# Altium PCB Phaser.PcbDoc (part 8 of 16)
Units mm, origin at the board's own origin, x right, y up, seen from the top; angles counter-clockwise.
Board outline 161.99 x 100 mm, 6 copper layers (TopLayer, MidLayer1, MidLayer2, SignalLayer1, Internal Plane 1, BottomLayer), stack 1.528 mm thick; 1017 components, 665 nets, 3453 pads, 2223 vias.
Unrouted connection lines stored in the file: 1.
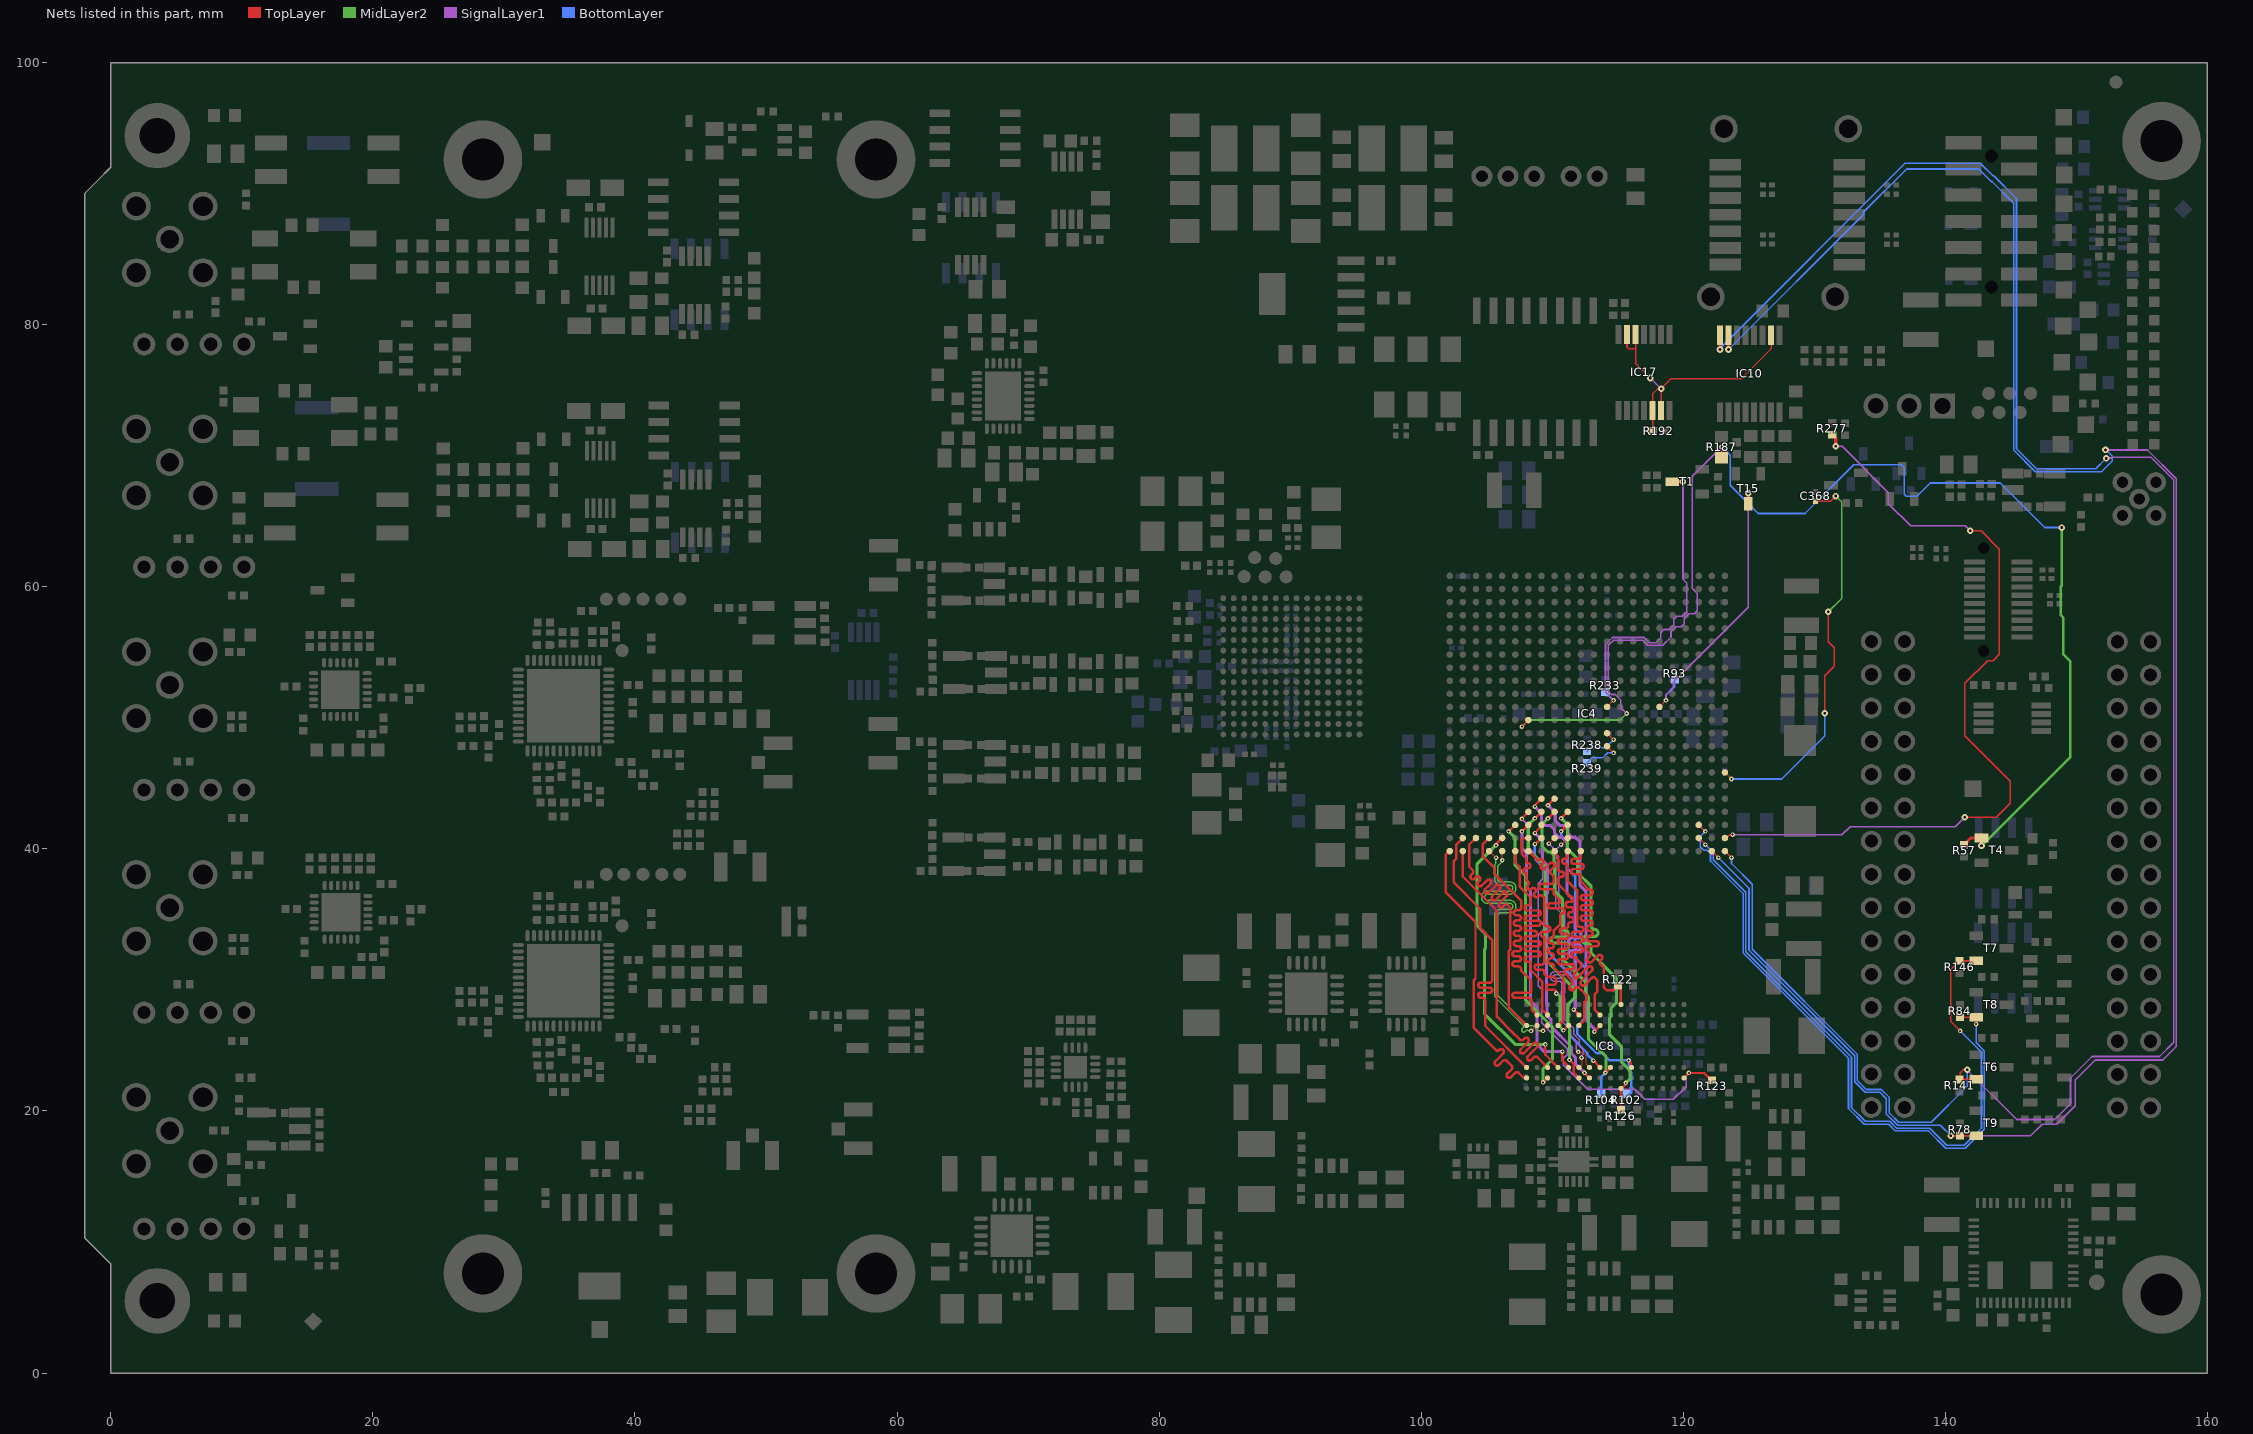
[diagram p10: the nets of this part, all layers, seen from the top]

## Via types
v1: diameter 0.5, hole 0.2, TopLayer to BottomLayer, tented both sides, 1374 vias
v2: diameter 0.35, hole 0.15, TopLayer to BottomLayer, tented both sides, 728 vias
v3: diameter 0.5, hole 0.2, TopLayer to BottomLayer, tented top, 96 vias
v4: diameter 0.6, hole 0.3, TopLayer to BottomLayer, 18 vias
v5: diameter 0.5, hole 0.2, TopLayer to BottomLayer, 5 vias
v6: diameter 0.35, hole 0.15, TopLayer to BottomLayer, 1 vias
v7: diameter 0.8, hole 0.5, TopLayer to BottomLayer, tented both sides, 1 vias

## Nets (pads, with @x,y where several pads share a name; then routed paths per layer and width w, separated by ;. In a path a pad name is that pad's centre, name@x,y a point inside that pad or via, vN(x,y) a via of type N, cw(c..) or ccw(c..) an arc to the next point about the centre after c; other vN are vias at no path point) (continued)
DDR3_CKE: IC4.L1 IC8.K9 R122.2 | length 25.4
  TopLayer w0.19: IC4.L1@112.175,39.825 112.175,39.63 112.175,39.435 cw(c111.98,39.435) 111.98,39.24 111.649,39.24 ccw(c111.649,39.045) 111.454,39.045 ccw(c111.649,39.045) 111.649,38.85 112.175,38.85 112.195,38.85 cw(c112.195,38.655) 112.39,38.655 cw(c112.195,38.655) 112.195,38.46 112.175,38.46 111.649,38.46 ccw(c111.649,38.265) 111.454,38.265 ccw(c111.649,38.265) 111.649,38.07 111.98,38.07 cw(c111.98,37.875) 112.175,37.875 112.175,37.68 112.175,37.522 112.64,37.057 ccw(c112.835,37.057) 112.835,36.862 112.891,36.862 cw(c112.891,36.667) 113.086,36.667 cw(c112.891,36.667) 112.891,36.472 112.64,36.472 112.364,36.472 ccw(c112.364,36.277) 112.169,36.277 ccw(c112.364,36.277) 112.364,36.082 112.64,36.082 112.891,36.082 cw(c112.891,35.887) 113.086,35.887 cw(c112.891,35.887) 112.891,35.692 112.64,35.692 112.364,35.692 ccw(c112.364,35.497) 112.169,35.497 ccw(c112.364,35.497) 112.364,35.302 112.64,35.302 112.891,35.302 cw(c112.891,35.107) 113.086,35.107 cw(c112.891,35.107) 112.891,34.912 112.64,34.912 112.364,34.912 ccw(c112.364,34.717) 112.169,34.717 ccw(c112.364,34.717) 112.364,34.522 112.64,34.522 112.891,34.522 cw(c112.891,34.327) 113.086,34.327 cw(c112.891,34.327) 112.891,34.132 112.835,34.132 ccw(c112.835,33.937) 112.64,33.937 ccw(c112.835,33.937) 112.835,33.742 112.891,33.742 cw(c112.891,33.547) 113.086,33.547 cw(c112.891,33.547) 112.891,33.352 112.835,33.352 ccw(c112.835,33.157) 112.64,33.157 ccw(c112.835,33.157) 112.835,32.962 113.355,32.962 cw(c113.355,32.767) 113.55,32.767 cw(c113.355,32.767) 113.355,32.572 112.835,32.572 ccw(c112.835,32.377) 112.64,32.377 112.64,32.228 112.69,32.178 112.699,32.169 112.836,32.032 cw(c112.699,31.894) 112.836,31.756 112.73,31.65 ccw(c112.868,31.512) 112.73,31.374 ccw(c112.868,31.512) 113.006,31.374 113.25,31.618 113.483,31.851 cw(c113.621,31.713) 113.759,31.851 cw(c113.621,31.713) 113.759,31.575 113.664,31.48 ccw(c113.802,31.342) 113.664,31.204 113.802,31.066 113.94,30.928 113.94,30.253 113.939,29.421 114.158,29.203 114.66,29.203 R122.2@115.015,29.558 115.241,29.332 IC8.K9@115.241,28.12
DDR3_DQ0: IC4.G3 IC8.E3 | length 21
  TopLayer w0.19: v2(107.675,41.325) IC4.G3@108.175,41.825 ; v2(110.765,24.528) 110.765,23.844 111.265,23.344 IC8.E3@111.241,23.32
  SignalLayer1 w0.24: v2(107.675,41.325) 107.675,40.04 108.02,39.696 108.02,37.078 108.34,36.758 108.34,28.398 108.845,27.893 108.845,25.069 109.386,24.528 v2(110.765,24.528)
DDR3_DQ1: IC4.J1 IC8.F7 | length 23.4
  TopLayer w0.19: IC4.J1@110.175,39.67 110.465,39.38 110.465,38.953 110.465,38.646 110.465,38.451 ccw(c110.66,38.451) 110.66,38.256 110.701,38.256 cw(c110.701,38.061) 110.896,38.061 cw(c110.701,38.061) 110.701,37.866 110.66,37.866 ccw(c110.66,37.671) 110.465,37.671 110.465,37.476 110.465,37.281 111.215,36.531 ccw(c111.41,36.531) 111.41,36.336 111.416,36.336 cw(c111.416,36.141) 111.611,36.141 cw(c111.416,36.141) 111.416,35.946 111.215,35.946 111.193,35.946 ccw(c111.193,35.751) 110.998,35.751 ccw(c111.193,35.751) 111.193,35.556 111.215,35.556 111.416,35.556 cw(c111.416,35.361) 111.611,35.361 cw(c111.416,35.361) 111.416,35.166 111.41,35.166 ccw(c111.41,34.971) 111.215,34.971 ccw(c111.41,34.971) 111.41,34.776 111.416,34.776 cw(c111.416,34.581) 111.611,34.581 cw(c111.416,34.581) 111.416,34.386 111.373,34.386 ccw(c111.373,34.228) 111.215,34.228 111.215,34.203 111.215,34.121 cw(c111.02,34.121) 111.02,33.926 110.776,33.926 ccw(c110.776,33.731) 110.581,33.731 ccw(c110.776,33.731) 110.776,33.536 111.02,33.536 cw(c111.02,33.341) 111.215,33.341 cw(c111.02,33.341) 111.02,33.146 110.626,33.146 ccw(c110.626,32.951) 110.431,32.951 ccw(c110.626,32.951) 110.626,32.756 111.02,32.756 cw(c111.02,32.561) 111.215,32.561 cw(c111.02,32.561) 111.02,32.366 110.626,32.366 ccw(c110.626,32.171) 110.431,32.171 ccw(c110.626,32.171) 110.626,31.976 111.02,31.976 cw(c111.02,31.781) 111.215,31.781 cw(c111.02,31.781) 111.02,31.586 110.626,31.586 ccw(c110.626,31.391) 110.431,31.391 ccw(c110.626,31.391) 110.626,31.196 111.215,31.196 111.5,31.196 cw(c111.5,31.001) 111.695,31.001 cw(c111.5,31.001) 111.5,30.806 111.215,30.806 111.123,30.806 ccw(c111.123,30.611) 110.928,30.611 ccw(c111.123,30.611) 111.123,30.416 cw(c111.123,30.324) 111.215,30.324 111.215,30.221 111.353,30.083 111.491,29.946 cw(c111.353,29.808) 111.491,29.67 111.368,29.547 ccw(c111.506,29.409) 111.368,29.272 ccw(c111.506,29.409) 111.644,29.272 111.767,29.394 cw(c111.904,29.256) 112.042,29.394 112.18,29.256 112.456,28.98 112.624,28.812 112.624,28.464 112.449,28.289 112.449,26.928 IC8.F7@112.041,26.52
DDR3_DQ2: IC4.H4 IC8.F2 | length 22.8
  TopLayer w0.19: v2(108.675,42.325) IC4.H4@109.175,42.825 ; v2(111.315,23.903) 111.64,23.578 111.64,22.921 IC8.F2@112.041,22.52
  MidLayer2 w0.24: v2(108.675,42.325) 108.165,41.815 108.165,39.953 109.44,38.678 109.44,31.553 111.749,29.244 111.749,28.679 111.188,28.117 111.188,26.744 111.315,26.617 v2(111.315,23.903)
DDR3_DQ3: IC4.H5 IC8.F8 | length 21.3
  TopLayer w0.19: v2@108.675,43.325 IC4.H5@109.175,43.825 ; v2(111.635,27.726) IC8.F8@112.041,27.32
  SignalLayer1 w0.24: v2(108.675,43.225) 108.675,43.218 109.165,42.728 109.165,42.103 109.498,41.77 109.859,41.77 110.175,41.454 110.175,41.196 110.491,40.88 110.749,40.88 111.12,40.509 111.12,40.428 111.12,37.003 111.12,36.598 111.755,35.963 111.755,34.628 111.755,33.928 ccw(c111.995,33.928) 111.995,33.688 ; v2(111.635,27.726) 111.759,27.85 111.755,27.855 111.755,31.528 ccw(c111.515,31.528) 111.515,31.768 111.486,31.768 cw(c111.486,32.008) 111.246,32.008 cw(c111.486,32.008) 111.486,32.248 111.755,32.248 111.951,32.248 ccw(c111.951,32.488) 112.191,32.488 ccw(c111.951,32.488) 111.951,32.728 111.755,32.728 111.486,32.728 cw(c111.486,32.968) 111.246,32.968 cw(c111.486,32.968) 111.486,33.208 111.755,33.208 111.951,33.208 ccw(c111.951,33.448) 112.191,33.448 ccw(c111.951,33.448) 111.951,33.688 111.995,33.688
DDR3_DQ4: IC4.H2 IC8.H3 | length 22
  TopLayer w0.19: v2@108.755,40.405 IC4.H2@109.175,40.825 ; v2(113.13,23.838) 113.13,23.835 113.641,23.323 IC8.H3@113.641,23.32
  BottomLayer w0.19: v2@108.665,40.315 108.665,39.503 109.475,38.693 109.475,33.341 ; v2(113.13,23.838) 112.649,24.318 112.649,24.437 111.34,25.746 111.34,26.353 111.165,26.528 111.165,28.053 111.724,28.612 111.724,30.04 110.219,31.545 ; 109.475,33.341 ccw(c112.015,33.341) 110.219,31.545 ; 109.475,33.341 ccw(c112.015,33.341) 110.219,31.545
  other v2: 108.665,40.353
DDR3_DQ5: IC4.K1 IC8.H8 | length 22.9
  TopLayer w0.19: IC4.K1@111.175,39.825 111.175,39.649 111.175,39.454 cw(c110.98,39.454) 110.98,39.259 110.939,39.259 ccw(c110.939,39.064) 110.744,39.064 ccw(c110.939,39.064) 110.939,38.869 110.98,38.869 cw(c110.98,38.674) 111.175,38.674 111.175,38.153 111.175,37.547 111.89,36.832 111.89,35.053 111.89,34.828 111.89,34.449 111.89,34.254 ccw(c112.085,34.254) 112.085,34.059 112.17,34.059 cw(c112.17,33.864) 112.365,33.864 cw(c112.17,33.864) 112.17,33.669 111.89,33.669 111.689,33.669 ccw(c111.689,33.474) 111.494,33.474 ccw(c111.689,33.474) 111.689,33.279 111.89,33.279 112.17,33.279 cw(c112.17,33.084) 112.365,33.084 cw(c112.17,33.084) 112.17,32.889 111.89,32.889 111.689,32.889 ccw(c111.689,32.694) 111.494,32.694 ccw(c111.689,32.694) 111.689,32.499 111.89,32.499 112.166,32.499 cw(c112.166,32.304) 112.361,32.304 cw(c112.166,32.304) 112.166,32.109 111.89,32.109 111.689,32.109 ccw(c111.689,31.914) 111.494,31.914 ccw(c111.689,31.914) 111.689,31.719 111.695,31.719 cw(c111.695,31.524) 111.89,31.524 111.961,31.453 112.035,31.379 112.172,31.242 cw(c112.035,31.104) 112.172,30.966 111.657,30.45 ccw(c111.794,30.312) 111.657,30.174 ccw(c111.794,30.312) 111.932,30.174 112.586,30.828 112.739,30.981 cw(c112.877,30.843) 113.015,30.981 cw(c112.877,30.843) 113.015,30.705 112.862,30.552 112.208,29.898 ccw(c112.346,29.76) 112.208,29.623 ccw(c112.346,29.76) 112.484,29.623 113,30.138 cw(c113.138,30.001) 113.276,30.138 113.425,29.989 113.425,29.089 113.257,28.921 113.257,27.704 IC8.H8@113.641,27.32
DDR3_DQ6: IC4.H3 IC8.G2 | length 21.3
  TopLayer w0.19: v2@108.665,41.228 109.175,41.738 IC4.H3@109.175,41.825 ; v2(112.458,22.903) IC8.G2@112.841,22.52
  SignalLayer1 w0.24: v2(108.665,41.203) 109.245,40.623 109.245,40.278 109.245,39.119 109.64,38.724 109.64,36.653 109.54,36.553 109.54,34.809 109.534,34.804 109.534,34.373 109.576,34.332 109.576,33.019 109.559,33.003 109.559,28.225 109.585,28.2 109.585,27.283 109.91,26.958 109.91,26.433 111.465,24.878 111.465,24.382 111.76,24.087 111.76,23.601 v2(112.458,22.903)
DDR3_DQ7: IC4.J5 IC8.H7 | length 20.4
  TopLayer w0.19: v2(109.675,43.325) IC4.J5@110.175,43.825 ; v2(113.211,26.053) 113.211,26.072 113.641,26.501 IC8.H7@113.641,26.52
  SignalLayer1 w0.24: v2(109.675,43.325) 110.222,42.778 110.222,42.149 110.601,41.77 110.859,41.77 111.175,41.454 111.175,41.196 111.491,40.88 111.763,40.88 112.125,40.518 112.125,37.193 112.559,36.758 112.559,28.912 112.649,28.822 112.649,26.839 113.211,26.278 v2(113.211,26.053)
DDR3_DQ8: IC4.G1 IC8.D7 | length 22.5
  TopLayer w0.19: IC4.G1@108.175,39.825 108.192,39.825 108.789,39.228 ; 108.79,39.228 108.853,39.165 ccw(c108.928,39.239) 109.003,39.165 cw(c109.14,39.027) 109.278,39.165 cw(c109.14,39.027) 109.278,38.889 109.204,38.814 109.172,38.783 ccw(c109.31,38.645) 109.172,38.507 ccw(c109.31,38.645) 109.448,38.507 109.479,38.539 109.836,38.896 cw(c109.974,38.758) 110.112,38.896 cw(c109.974,38.758) 110.112,38.62 109.893,38.401 ccw(c110.031,38.263) 109.893,38.125 110.031,37.987 110.115,37.903 110.115,37.708 110.115,37.513 cw(c109.92,37.513) 109.92,37.318 109.19,37.318 ccw(c109.19,37.123) 108.995,37.123 ccw(c109.19,37.123) 109.19,36.928 109.92,36.928 cw(c109.92,36.733) 110.115,36.733 110.115,36.549 110.615,36.049 110.615,36.038 cw(c110.42,36.038) 110.42,35.843 109.864,35.843 ccw(c109.864,35.648) 109.669,35.648 ccw(c109.864,35.648) 109.864,35.453 110.615,35.453 110.741,35.453 cw(c110.741,35.258) 110.936,35.258 cw(c110.741,35.258) 110.741,35.063 ccw(c110.741,34.937) 110.615,34.937 110.615,34.673 110.615,34.478 ; 110.114,30.978 110.114,30.949 110.824,30.239 110.824,28.28 110.825,28.279 110.825,26.905 IC8.D7@110.441,26.52 ; 110.115,30.978 110.115,31.048 ccw(c109.92,31.048) 109.92,31.243 109.864,31.243 cw(c109.864,31.438) 109.669,31.438 cw(c109.864,31.438) 109.864,31.633 109.92,31.633 ccw(c109.92,31.828) 110.115,31.828 ccw(c109.92,31.828) 109.92,32.023 109.864,32.023 cw(c109.864,32.218) 109.669,32.218 cw(c109.864,32.218) 109.864,32.413 109.92,32.413 ccw(c109.92,32.608) 110.115,32.608 ccw(c109.92,32.608) 109.92,32.803 109.864,32.803 cw(c109.864,32.998) 109.669,32.998 cw(c109.864,32.998) 109.864,33.193 109.92,33.193 ccw(c109.92,33.388) 110.115,33.388 110.115,33.583 110.115,33.778 110.615,34.278 ; 110.614,34.278 110.614,34.478
DDR3_DQ9: IC4.B1 IC8.C3 | length 23.5
  TopLayer w0.19: IC4.B1@103.175,39.825 103.165,39.815 103.165,37.878 105.765,35.278 105.765,27.196 106.937,26.024 107.521,25.44 ccw(c107.656,25.574) 107.79,25.44 107.883,25.532 cw(c108.017,25.398) 108.152,25.532 cw(c108.017,25.398) 108.152,25.263 107.925,25.036 107.591,24.703 ccw(c107.725,24.569) 107.591,24.434 ccw(c107.725,24.569) 107.86,24.434 108.193,24.768 108.582,25.157 cw(c108.717,25.023) 108.851,25.157 cw(c108.717,25.023) 108.851,24.888 108.462,24.499 108.129,24.166 ccw(c108.263,24.031) 108.129,23.897 ccw(c108.263,24.031) 108.397,23.897 108.596,24.096 cw(c108.731,23.962) 108.865,24.096 IC8.C3@109.641,23.32
DDR3_DQ10: IC4.F1 IC8.C8 | length 24.1
  TopLayer w0.19: IC4.F1@107.174,39.825 107.174,38.955 107.509,38.62 107.509,37.129 108.369,36.269 108.369,36.074 108.369,35.879 cw(c108.174,35.879) 108.174,35.684 108.088,35.684 ccw(c108.088,35.489) 107.893,35.489 ccw(c108.088,35.489) 108.088,35.294 108.369,35.294 108.92,35.294 cw(c108.92,35.099) 109.115,35.099 cw(c108.92,35.099) 108.92,34.904 108.369,34.904 108.088,34.904 ccw(c108.088,34.709) 107.893,34.709 ccw(c108.088,34.709) 108.088,34.514 108.369,34.514 108.915,34.514 cw(c108.915,34.319) 109.11,34.319 cw(c108.915,34.319) 108.915,34.124 108.369,34.124 108.088,34.124 ccw(c108.088,33.929) 107.893,33.929 ccw(c108.088,33.929) 108.088,33.734 108.369,33.734 108.634,33.734 cw(c108.634,33.539) 108.829,33.539 cw(c108.634,33.539) 108.634,33.344 108.369,33.344 108.088,33.344 ccw(c108.088,33.149) 107.893,33.149 ccw(c108.088,33.149) 108.088,32.954 108.369,32.954 108.915,32.954 cw(c108.915,32.759) 109.11,32.759 cw(c108.915,32.759) 108.915,32.564 108.369,32.564 108.088,32.564 ccw(c108.088,32.369) 107.893,32.369 ccw(c108.088,32.369) 108.088,32.174 108.369,32.174 108.915,32.174 cw(c108.915,31.979) 109.11,31.979 cw(c108.915,31.979) 108.915,31.784 108.369,31.784 108.088,31.784 ccw(c108.088,31.589) 107.893,31.589 ccw(c108.088,31.589) 108.088,31.394 108.174,31.394 cw(c108.174,31.199) 108.369,31.199 108.369,31.004 108.369,30.778 108.369,30.732 109.248,29.853 109.248,29.63 109.248,29.288 109.249,29.287 109.249,27.711 IC8.C8@109.641,27.32
DDR3_DQ11: IC4.F3 IC8.C2 | length 22
  TopLayer w0.19: v2(106.675,41.325) IC4.F3@107.175,41.825 ; v2(109.299,22.178) IC8.C2@109.641,22.52
  MidLayer2 w0.24: v2(106.675,41.325) 107.165,40.835 107.165,38.75 107.965,37.95 107.965,28.453 110.015,26.403 110.015,23.953 109.299,23.237 v2(109.299,22.178)
DDR3_DQ12: IC4.C2 IC8.A7 | length 23.5
  TopLayer w0.19: IC4.C2@104.175,40.825 103.665,40.315 103.665,39.622 103.655,39.612 103.655,38.651 103.789,38.516 103.924,38.382 cw(c103.789,38.248) 103.924,38.113 103.807,37.997 ccw(c103.941,37.862) 103.807,37.728 ccw(c103.941,37.862) 104.076,37.728 104.192,37.845 cw(c104.327,37.71) 104.461,37.845 cw(c104.327,37.71) 104.461,37.576 104.344,37.459 ccw(c104.479,37.325) 104.344,37.191 ccw(c104.479,37.325) 104.613,37.191 104.864,37.442 105.022,37.6 cw(c105.156,37.465) 105.291,37.6 cw(c105.156,37.465) 105.291,37.331 105.133,37.173 104.882,36.922 ccw(c105.016,36.787) 104.882,36.653 ccw(c105.016,36.787) 105.15,36.653 105.402,36.904 105.7,37.203 cw(c105.834,37.068) 105.969,37.203 cw(c105.834,37.068) 105.969,36.934 105.67,36.636 105.419,36.384 ccw(c105.553,36.25) 105.419,36.116 ccw(c105.553,36.25) 105.688,36.116 105.939,36.367 106.237,36.665 cw(c106.372,36.531) 106.506,36.665 cw(c106.372,36.531) 106.506,36.396 106.208,36.098 105.956,35.847 ccw(c106.091,35.713) 105.956,35.578 ccw(c106.091,35.713) 106.225,35.578 106.342,35.695 cw(c106.476,35.561) 106.611,35.695 106.785,35.521 106.785,32.298 106.678,32.191 106.678,27.883 IC8.A7@108.041,26.52
DDR3_DQ13: IC4.A1 IC8.A2 | length 23.5
  TopLayer w0.19: IC4.A1@102.175,39.825 101.865,39.515 101.865,36.703 104.14,34.428 104.14,30.103 103.99,29.953 103.99,26.353 105.69,24.653 ccw(c105.828,24.791) 105.966,24.653 cw(c106.104,24.515) 106.242,24.653 cw(c106.104,24.515) 106.242,24.377 106.104,24.239 105.648,23.784 ccw(c105.786,23.646) 105.648,23.508 ccw(c105.786,23.646) 105.924,23.508 106.242,23.826 cw(c106.379,23.688) 106.517,23.826 106.615,23.728 106.753,23.59 106.891,23.452 cw(c106.753,23.314) 106.891,23.176 106.573,22.859 ccw(c106.711,22.721) 106.573,22.583 ccw(c106.711,22.721) 106.849,22.583 107.169,22.903 cw(c107.304,22.767) 107.44,22.903 107.823,22.52 IC8.A2@108.041,22.52
DDR3_DQ14: IC4.D2 IC8.B8 | length 23
  TopLayer w0.19: IC4.D2@105.175,40.825 104.675,40.325 104.675,39.455 105.56,38.57 105.56,38.103 107.614,36.048 107.614,36.003 107.614,35.878 107.614,35.703 107.614,35.508 cw(c107.419,35.508) 107.419,35.313 107.259,35.313 ccw(c107.259,35.118) 107.064,35.118 ccw(c107.259,35.118) 107.259,34.923 107.419,34.923 cw(c107.419,34.728) 107.614,34.728 cw(c107.419,34.728) 107.419,34.533 107.259,34.533 ccw(c107.259,34.338) 107.064,34.338 ccw(c107.259,34.338) 107.259,34.143 107.419,34.143 cw(c107.419,33.948) 107.614,33.948 cw(c107.419,33.948) 107.419,33.753 107.259,33.753 ccw(c107.259,33.558) 107.064,33.558 ccw(c107.259,33.558) 107.259,33.363 107.419,33.363 cw(c107.419,33.168) 107.614,33.168 cw(c107.419,33.168) 107.419,32.973 107.259,32.973 ccw(c107.259,32.778) 107.064,32.778 ccw(c107.259,32.778) 107.259,32.583 107.419,32.583 cw(c107.419,32.388) 107.614,32.388 cw(c107.419,32.388) 107.419,32.193 107.152,32.193 ccw(c107.152,31.998) 106.957,31.998 ccw(c107.152,31.998) 107.152,31.803 107.419,31.803 cw(c107.419,31.608) 107.614,31.608 cw(c107.419,31.608) 107.419,31.413 107.152,31.413 ccw(c107.152,31.218) 106.957,31.218 ccw(c107.152,31.218) 107.152,31.023 107.419,31.023 cw(c107.419,30.828) 107.614,30.828 107.614,30.728 108.408,29.934 108.408,29.403 108.408,29.208 cw(c108.213,29.208) 108.213,29.013 107.152,29.013 ccw(c107.152,28.818) 106.957,28.818 ccw(c107.152,28.818) 107.152,28.623 108.213,28.623 cw(c108.213,28.428) 108.408,28.428 108.408,28.296 108.425,28.279 108.425,27.735 IC8.B8@108.841,27.32
DDR3_DQ15: IC4.B2 IC8.A3 | length 23.4
  TopLayer w0.19: IC4.B2@103.175,40.825 102.675,40.325 102.675,39.253 102.465,39.043 102.465,37.453 104.49,35.428 104.49,33.953 105.406,33.037 105.406,29.973 cw(c105.216,29.973) 105.216,29.783 104.865,29.783 104.539,29.783 ccw(c104.539,29.593) 104.349,29.593 ccw(c104.539,29.593) 104.539,29.403 104.865,29.403 105.216,29.403 cw(c105.216,29.213) 105.406,29.213 cw(c105.216,29.213) 105.216,29.023 104.865,29.023 104.539,29.023 ccw(c104.539,28.833) 104.349,28.833 ccw(c104.539,28.833) 104.539,28.643 104.675,28.643 cw(c104.675,28.453) 104.865,28.453 104.865,26.496 IC8.A3@108.041,23.32
DDR3_LDM: IC4.G2 IC8.E7 | length 22.4
  TopLayer w0.19: IC4.G2@108.175,40.825 107.811,40.825 107.664,40.678 107.664,39.628 108.019,39.273 108.019,39.017 ccw(c108.133,39.017) 108.133,38.903 cw(c108.133,38.708) 108.328,38.708 cw(c108.133,38.708) 108.133,38.513 108.019,38.513 107.983,38.513 ccw(c107.983,38.318) 107.788,38.318 ccw(c107.983,38.318) 107.983,38.123 cw(c107.983,38.087) 108.019,38.087 108.019,37.928 108.019,37.623 108.026,37.615 108.136,37.506 cw(c107.998,37.368) 108.136,37.23 108.107,37.201 ccw(c108.245,37.063) 108.107,36.925 ccw(c108.245,37.063) 108.383,36.925 108.412,36.955 cw(c108.55,36.817) 108.687,36.955 cw(c108.55,36.817) 108.687,36.679 108.645,36.637 ccw(c108.783,36.499) 108.645,36.361 ccw(c108.783,36.499) 108.921,36.361 108.963,36.403 cw(c109.101,36.265) 109.239,36.403 109.394,36.248 109.394,35.85 109.389,35.844 109.389,35.452 109.394,35.446 109.394,34.708 109.389,34.703 109.389,34.468 109.389,34.273 ccw(c109.584,34.273) 109.584,34.078 109.652,34.078 cw(c109.652,33.883) 109.847,33.883 cw(c109.652,33.883) 109.652,33.688 109.389,33.688 109.301,33.688 ccw(c109.301,33.493) 109.106,33.493 ccw(c109.301,33.493) 109.301,33.298 cw(c109.301,33.21) 109.389,33.21 109.389,33.103 109.389,32.955 109.389,32.563 109.389,32.175 109.389,31.783 109.389,31.753 109.389,31.558 109.389,31.363 cw(c109.194,31.363) 109.194,31.168 108.843,31.168 ccw(c108.843,30.973) 108.648,30.973 ccw(c108.843,30.973) 108.843,30.778 109.194,30.778 cw(c109.194,30.583) 109.389,30.583 109.389,30.453 109.614,30.228 110.094,30.228 110.303,30.019 110.303,29.824 cw(c110.108,29.824) 110.108,29.629 109.722,29.629 ccw(c109.722,29.434) 109.527,29.434 ccw(c109.722,29.434) 109.722,29.239 110.108,29.239 cw(c110.108,29.044) 110.303,29.044 v2@110.303,28.963 ; v2(110.84,26.153) 110.874,26.153 IC8.E7@111.241,26.52
  MidLayer2 w0.24: v2@110.364,28.953 110.59,28.727 110.59,26.403 v2(110.84,26.153)
  other v2: 110.304,28.963
DDR3_LDQS_N: IC4.J2 IC8.G3 | length 21.3
  TopLayer w0.095: v2(109.74,40.39) IC4.J2@110.175,40.825 ; v2(111.979,24.513) 112.075,24.513 112.152,24.435 112.384,24.435 112.602,24.217 112.602,23.908 112.601,23.907 112.601,23.56 IC8.G3@112.841,23.32
  SignalLayer1 w0.115: v2(109.74,40.39) 110.09,40.04 110.09,39.161 110.249,39.002 110.249,35.519 110.705,35.063 110.705,31.253 ccw(c111.072,31.253) 111.072,30.885 111.101,30.885 cw(c111.101,30.753) 111.233,30.753 cw(c111.101,30.753) 111.101,30.62 110.214,30.62 ccw(c110.214,30.253) 109.847,30.253 ccw(c110.214,30.253) 110.214,29.885 110.572,29.885 cw(c110.572,29.753) 110.705,29.753 110.705,29.137 110.687,29.119 110.687,28.581 110.705,28.563 110.705,26.888 111.415,26.178 111.415,25.753 111.812,25.356 111.812,24.656 111.955,24.513 v2(111.979,24.513)
DDR3_LDQS_P: IC4.K2 IC8.F3 | length 21.1
  TopLayer w0.095: v2(110.675,40.325) IC4.K2@111.175,40.825 ; IC8.F3@112.041,23.32 112.281,23.56 112.281,23.762 112.229,23.814 v2(112.229,24.063)
  SignalLayer1 w0.115: v2(110.675,40.325) 110.325,39.975 110.325,39.258 110.394,39.19 110.484,39.1 110.484,35.669 110.94,35.213 110.94,31.253 ccw(c111.072,31.253) 111.072,31.12 111.101,31.12 cw(c111.101,30.753) 111.468,30.753 cw(c111.101,30.753) 111.101,30.385 110.214,30.385 ccw(c110.214,30.253) 110.082,30.253 ccw(c110.214,30.253) 110.214,30.12 110.572,30.12 cw(c110.572,29.753) 110.94,29.753 110.94,29.039 ; v2@112.133,24.13 112.138,24.13 112.362,24.354 112.362,24.671 112.138,24.895 112.114,24.895 112.047,24.962 112.047,25.453 111.65,25.85 111.65,26.275 110.94,26.985 110.94,28.603 110.897,28.646 110.897,28.996 110.922,29.021 ; 110.922,29.021 110.94,29.039 ; 110.922,29.021 110.931,29.03 110.94,29.039
DDR3_ODT: IC4.K4 IC8.K1 R126.2 | length 27.7
  TopLayer w0.19: v2(110.675,42.325) IC4.K4@111.175,42.825 ; R126.2@115.24,20.073 IC8.K1@115.24,21.712 ; IC8.K1@115.24,21.719 IC8.K1@115.24,21.712 ; IC8.K1@115.241,21.72 115.232,21.72 IC8.K1@115.24,21.712 ; v2(115.605,22.138) 115.605,22.026 115.27,21.691 115.265,21.687 IC8.K1@115.24,21.712
  MidLayer2 w0.24: v2(110.675,42.325) 111.159,41.84 111.159,40.009 111.927,39.24 111.927,38.191 112.965,37.153 112.965,34.978 112.965,34.123 ccw(c113.235,34.123) 113.235,33.853 113.22,33.853 cw(c113.22,33.583) 113.49,33.583 cw(c113.22,33.583) 113.22,33.313 112.965,33.313 112.553,33.313 ccw(c112.553,33.043) 112.283,33.043 ccw(c112.553,33.043) 112.553,32.773 112.695,32.773 cw(c112.695,32.503) 112.965,32.503 112.965,32.053 114.89,30.128 114.89,28.252 114.475,27.837 114.475,27.192 114.37,27.087 114.37,25.823 115.29,24.903 115.29,23.703 115.935,23.058 115.935,22.468 v2(115.605,22.138)
DDR3_RAS_N: IC4.J4 IC8.J3 R104.1 | length 27.6
  TopLayer w0.19: v2(109.675,42.325) IC4.J4@110.175,42.825 ; v2(114.055,22.913) 114.055,22.923 114.441,23.309 IC8.J3@114.441,23.32
  MidLayer2 w0.24: v2(109.675,42.325) 109.215,41.865 109.215,40.203 109.669,39.749 109.874,39.749 110.135,39.488 110.135,38.983 110.19,38.928 110.19,36.753 110.765,36.178 110.765,34.228 110.765,34.003 ccw(c111.005,34.003) 111.005,33.763 ; 110.974,33.763 cw(c110.974,33.523) 111.214,33.523 cw(c110.974,33.523) 110.974,33.283 110.765,33.283 110.141,33.283 ccw(c110.141,33.043) 109.901,33.043 ccw(c110.141,33.043) 110.141,32.803 110.765,32.803 111.005,32.803 cw(c111.005,32.563) 111.245,32.563 cw(c111.005,32.563) 111.005,32.323 ccw(c111.005,32.083) 110.765,32.083 110.765,31.843 110.765,31.603 112.54,29.828 112.54,28.932 112.766,28.706 112.766,25.481 114.085,24.162 114.085,22.943 v2(114.055,22.913) ; 110.984,33.763 110.994,33.763
  BottomLayer w0.19: R104.1@113.735,21.295 113.735,22.582 114.055,22.901 v2(114.055,22.913)
DDR3_RESET_N: IC4.G4 IC8.T2 R123.2 | length 36.1
  TopLayer w0.19: v2@107.679,42.329 IC4.G4@108.175,42.825 ; IC8.T2@120.041,22.52 120.415,22.894 121.579,22.894 R123.2@122.12,22.353
  SignalLayer1 w0.1: v2(107.679,42.288) 108.14,41.828 108.14,40.153 108.69,39.603 108.69,39.152 109.29,38.552 109.29,37.728 108.915,37.353 108.915,34.639 109.329,34.225 109.329,33.852 108.915,33.437 108.915,29.558 109.204,29.268 109.204,26.719 109.665,26.258 109.665,26.228 111.14,24.753 111.14,24.303 110.84,24.003 110.84,23.528 112.715,21.653 116.29,21.653 117.065,20.878 119.24,20.878 120.215,21.853 120.215,22.703 v2(120.415,22.903)
DDR3_UDM: IC4.E2 IC8.D3 | length 22.3
  TopLayer w0.19: v2@105.715,40.274 v2(105.704,40.263) 105.704,40.354 IC4.E2@106.175,40.825 ; v2(109.465,25.078) 109.465,24.296 IC8.D3@110.441,23.32
  MidLayer2 w0.24: v2(105.704,40.263) 105.692,40.263 104.245,38.816 104.245,34.148 104.91,33.483 104.91,32.425 104.815,32.33 104.815,27.428 107.165,25.078 v2(109.465,25.078)
DDR3_UDQS_N: IC4.D1 IC8.B7 | length 23.1
  TopLayer w0.095: IC4.D1@105.175,39.825 v2@105.693,39.307 ; v2(108.379,26.113) 108.434,26.113 IC8.B7@108.841,26.52
  MidLayer2 w0.115: v2(105.715,39.328) 105.69,39.303 105.69,38.885 105.597,38.793 105.597,37.703 ccw(c106.065,37.703) 106.065,37.235 106.76,37.235 cw(c106.76,37.003) 106.993,37.003 cw(c106.76,37.003) 106.76,36.77 105.07,36.77 ccw(c105.07,36.303) 104.602,36.303 ccw(c105.07,36.303) 105.07,35.835 106.76,35.835 cw(c106.76,35.603) 106.993,35.603 cw(c106.76,35.603) 106.76,35.37 106.065,35.37 ccw(c106.065,34.903) 105.597,34.903 105.597,28.72 107.76,26.558 ; 107.515,26.803 107.648,26.67 107.76,26.558 ; v2(108.379,26.113) 108.205,26.113 ccw(c108.094,26.001) 107.983,26.113 107.924,26.054 cw(c107.813,26.166) 107.701,26.054 cw(c107.813,26.166) 107.701,26.277 107.76,26.335 ccw(c107.648,26.447) 107.76,26.558
DDR3_UDQS_P: IC4.E1 IC8.C7 | length 22.7
  TopLayer w0.095: v2@106.182,39.135 IC4.E1@106.182,39.818 ; v2(109.29,26.103) 109.29,26.169 IC8.C7@109.641,26.52
  MidLayer2 w0.115: v2(106.19,39.128) 106.19,39.053 105.832,38.696 105.832,37.703 ccw(c106.065,37.703) 106.065,37.47 106.76,37.47 cw(c106.76,37.003) 107.228,37.003 cw(c106.76,37.003) 106.76,36.535 105.07,36.535 ccw(c105.07,36.303) 104.837,36.303 ccw(c105.07,36.303) 105.07,36.07 106.76,36.07 cw(c106.76,35.603) 107.228,35.603 cw(c106.76,35.603) 106.76,35.135 106.065,35.135 ccw(c106.065,34.903) 105.832,34.903 105.832,28.818 108.155,26.495 108.538,26.495 108.93,26.103 v2(109.29,26.103)
DDR3_WE_N: IC4.K3 IC8.L3 R102.1 | length 25.4
  TopLayer w0.19: v2(110.675,41.325) IC4.K3@111.175,41.825 ; v2(115.826,23.863) 115.826,23.819 116.001,23.645 116.001,23.36 IC8.L3@116.041,23.32
  BottomLayer w0.19: v2(110.675,41.325) 110.675,40.954 111.184,40.445 111.184,38.453 111.74,37.897 111.74,31.703 112.574,30.868 112.574,28.862 112.624,28.812 112.624,27.212 111.901,26.489 111.901,25.884 113.387,24.398 113.814,24.398 114.349,23.863 v2(115.826,23.863) 115.826,23.11 116.04,22.896 116.04,21.419 R102.1@115.916,21.295
DXN_0: IC4.N9 R239.2 | length 3.1
  TopLayer w0.125: IC4.N9@114.175,47.825 v2(114.675,47.325)
  BottomLayer w0.125: R239.2@112.65,46.57 112.67,46.57 112.898,46.798 112.898,46.818 113.017,46.937 113.836,46.937 114.223,47.325 v2(114.675,47.325)
DXP_0: IC4.N10 R238.2 | length 3.1
  TopLayer w0.125: IC4.N10@114.175,48.825 v2(114.675,48.325)
  BottomLayer w0.125: R238.2@112.65,47.43 112.67,47.43 112.963,47.723 114.073,47.723 v2(114.675,48.325)
EEM0_I2C_SCL: IC4.AB1 IC10.8 R141.2 T6.2 | length 164.4
  TopLayer w0.125: IC4.AB1@123.175,39.825 v2(123.675,39.325) ; v1(141.65,23.13) 141.339,23.13 141.122,22.914 141.122,22.442 R141.2@141.075,22.395 142.345,22.395 T6.2@142.35,22.4
  TopLayer w0.25: v1(122.795,78.1) IC10.8@122.795,79.2
  SignalLayer1 w0.125: v1(141.65,23.13) 145.437,19.343 148.343,19.343 149.538,20.538 149.538,22.515 151.176,24.153 156.334,24.153 157.417,25.235 157.417,68.149 155.686,69.88 152.755,69.88 152.693,69.818 152.285,69.818 v1(152.255,69.788)
  BottomLayer w0.125: v1(122.795,78.1) 122.795,78.168 122.92,78.293 122.92,78.317 136.919,92.317 142.666,92.317 143.633,91.35 143.691,91.35 145.419,89.623 145.419,70.524 146.95,68.993 151.46,68.993 v1(152.255,69.788) ; v2(123.675,39.325) 123.675,38.874 125.249,37.3 125.249,32.335 133.281,24.303 133.281,22.308 133.958,21.631 135.111,21.631 135.723,21.019 135.723,19.839 136.427,19.135 138.921,19.135 141.65,21.864 v1(141.65,23.13)
EEM0_I2C_SDA: IC4.AA1 IC10.7 R78.2 T9.2 | length 162.8
  TopLayer w0.125: IC4.AA1@122.175,39.825 v2(122.675,39.325) ; v1(140.417,18.1) R78.2@141.1,18.1 T9.2@142.35,18.1
  TopLayer w0.25: v1(123.445,78.1) IC10.7@123.445,79.2
  SignalLayer1 w0.125: v1(140.417,18.1) 146.495,18.1 147.375,18.98 148.494,18.98 149.9,20.387 149.9,22.364 151.427,23.891 156.586,23.891 157.618,24.923 157.618,68.233 155.414,70.436 v1(152.21,70.436)
  BottomLayer w0.125: v2(122.675,39.325) 125.014,36.986 125.014,32.267 133.067,24.214 133.067,22.22 133.869,21.417 134.999,21.417 135.492,20.924 135.492,19.767 136.356,18.904 139.613,18.904 v1(140.417,18.1) ; v1(123.445,78.1) 133.775,88.43 133.775,88.602 137.048,91.875 142.541,91.875 143.5,90.916 143.551,90.916 145.205,89.263 145.205,70.435 146.861,68.779 151.9,68.779 152.718,69.596 152.718,69.979 152.261,70.436 v1(152.21,70.436)
EEM1_I2C_SCL: IC4.Y2 R146.2 T7.2 | length 52.3
  TopLayer w0.125: IC4.Y2@121.175,40.825 v2(121.675,40.325) ; v2(141.122,26.103) 140.4,26.825 140.4,30.77 140.89,31.26 140.89,31.28 141.055,31.445 R146.2@141.075,31.445 142.345,31.445 T7.2@142.35,31.45
  BottomLayer w0.125: v2(121.675,40.325) 122.288,39.712 122.288,39.164 124.773,36.679 124.773,32.155 132.833,24.094 132.833,20.253 133.885,19.201 135.756,19.201 136.267,18.69 138.793,18.69 140.108,17.375 141.425,17.375 142.75,18.7 142.75,24.475 v2(141.122,26.103)
EEM1_I2C_SDA: IC4.Y3 R84.2 T8.2 | length 49.1
  TopLayer w0.125: IC4.Y3@121.175,41.825 v2(121.675,41.325) ; R84.2@141.1,27.15 T8.2@142.35,27.15 142.344,27.144 v2(142.344,26.623)
  BottomLayer w0.125: v2(121.675,41.325) 121.288,40.937 121.288,40.164 121.568,39.884 121.814,39.884 122.074,39.624 122.074,39.076 124.559,36.591 124.559,32.066 132.603,24.022 132.603,20.181 133.796,18.987 135.667,18.987 136.179,18.476 138.704,18.476 140.019,17.161 141.514,17.161 142.964,18.611 142.964,24.564 142.938,24.59 142.938,24.6 142.344,25.194 v2(142.344,26.623)
FAN_PWM: C368.2 IC4.AB7 | length 30.3
  TopLayer w0.125: IC4.AB7@123.175,45.825 v2(123.675,45.325) ; C368.2@130.089,66.543 131.244,66.543 v1(131.619,66.918) ; v1(130.786,50.358) 130.786,53.209 131.516,53.94 131.516,55.336 131.054,55.798 v1(131.054,58.086)
  MidLayer2 w0.125: v1(131.054,58.086) 132.075,59.107 132.075,66.462 v1(131.619,66.918)
  BottomLayer w0.125: v2(123.675,45.325) 127.508,45.325 130.79,48.607 130.786,48.611 v1(130.786,50.358) ; v1@131.575,66.874 v1(131.619,66.918)
FAN_TACHO: IC4.AB2 R277.1 | length 62.3
  TopLayer w0.1: IC4.AB2@123.175,40.825 123.283,40.825 123.492,41.034 123.717,41.034 v2(123.765,41.082) ; v5(141.468,42.407) 141.54,42.479 141.612,42.407 143.892,42.407 144.95,43.466 144.95,45.143 141.483,48.61 141.483,52.625 143.209,54.35 143.642,54.35 144.12,54.828 144.12,62.873 142.728,64.265 v1(141.885,64.265)
  TopLayer w0.25: R277.1@131.359,71.584 131.379,71.584 131.544,71.419 131.544,71.399 131.619,71.323 v1(131.619,70.725)
  SignalLayer1 w0.1: v2(123.765,41.082) 132.105,41.082 132.726,41.702 140.763,41.702 v5(141.468,42.407) ; v1(131.619,70.725) 132.11,70.725 135.653,67.183 135.653,66.345 137.346,64.651 141.499,64.651 v1(141.885,64.265)
FLASH_UP_EN: IC10.2 IC17.5 IC17.6 IC17.12 IC17.13 R192.1 | length 22.6
  TopLayer w0.115: IC17.13@115.7,79.25 115.7,78.291 115.838,78.153 116.35,78.153 ; IC17.12@116.35,79.25 116.35,78.153 ; v1(117.478,75.928) 116.35,77.055 116.35,78.153 ; R192.1@117.655,71.875 117.655,73.445 IC17.5@117.65,73.45 117.65,74.731 117.978,75.059 118.254,75.059 v1(118.3,75.105) ; IC17.6@118.3,73.45 v1(118.3,75.105) ; IC10.2@126.695,79.2 126.695,78.145 124.43,75.88 119.075,75.88 v1(118.3,75.105)
  SignalLayer1 w0.115: v1(117.478,75.928) v1(118.3,75.105)
FPGA_DONE: IC4.G11 R57.1 R187.1 T4.1 | length 102.7
  TopLayer w0.125: v2(107.675,49.325) IC4.G11@108.175,49.825
  TopLayer w0.2: v1(142.75,40.22) T4.1@142.75,40.825
  TopLayer w0.25: R187.1@122.92,69.85 v2@122.92,70.675 ; R57.1@141.425,40.32 141.93,40.825 T4.1@142.75,40.825
  MidLayer2 w0.125: v2(107.675,49.325) 108.181,49.831 115.181,49.831 v2(115.675,50.325)
  MidLayer2 w0.2: v1(142.75,40.22) 149.511,46.981 149.511,54.326 148.999,54.838 148.999,57.629 148.8,57.828 148.8,60.013 148.861,60.074 v1(148.861,64.516)
  SignalLayer1 w0.125: v2(115.675,50.325) 115.232,50.768 115.232,51.35 114.805,51.777 114.511,51.777 114.276,52.012 114.276,55.521 114.677,55.923 116.89,55.923 117.277,55.535 118.433,55.535 119.063,56.165 119.063,56.486 119.059,56.489 119.059,56.592 119.405,56.938 119.836,56.938 120.063,57.165 120.063,57.595 120.405,57.938 120.836,57.938 121.063,58.165 121.063,59.486 120.675,59.873 120.675,68.43 v2@122.92,70.675
  BottomLayer w0.125: v2@122.92,70.675 123.575,70.02 123.575,67.731 125.723,65.583 129.286,65.583 132.998,69.295 136.641,69.295 136.861,69.075 136.861,67.046 137.006,66.9 137.827,66.9 138.844,67.917 144.173,67.917 147.574,64.516 v1(148.861,64.516)
  other v2: 122.913,70.673
FPGA_INIT_B: IC4.U12 R93.1 T15.3 | length 21.8
  TopLayer w0.125: IC4.U12@118.175,50.825 v2(118.675,51.325)
  TopLayer w0.25: T15.3@124.945,66.325 v1(124.945,67.15)
  SignalLayer1 w0.125: v2(118.675,51.325) 118.675,51.777 119.236,52.338 119.236,52.718 124.945,58.428 v1(124.945,67.15)
  BottomLayer w0.125: v2(118.675,51.325) 118.675,51.7 119.35,52.375 R93.1@119.35,52.905
FPGA_PROGRAM_B: IC4.N12 R233.1 T1.3 | length 24.9
  TopLayer w0.125: IC4.N12@114.175,50.825 v2(114.675,51.325)
  TopLayer w0.25: T1.3@119.145,68.025 v1(119.97,68.025)
  SignalLayer1 w0.125: v2(114.675,51.325) 114.063,51.938 114.063,55.592 114.594,56.124 117.027,56.124 117.415,55.736 117.919,55.736 118.264,56.081 118.264,56.495 118.505,56.736 118.919,56.736 119.264,57.081 119.264,57.512 119.488,57.736 119.919,57.736 120.264,58.081 120.264,60.284 119.97,60.578 v1(119.97,68.025)
  BottomLayer w0.125: R233.1@114.15,51.833 114.17,51.833 114.398,51.605 114.398,51.585 114.658,51.325 v2(114.675,51.325)